# Altium PCB DC-DC_BUCK-BOOST.PcbDoc (part 2 of 3)
Units mm, origin at the board's own origin, x right, y up, seen from the top; angles counter-clockwise.
Board outline 250 x 400 mm, 4 copper layers (Top Layer 1, Top Layer, Bottom Layer, Bottom Layer 1), stack 0.603 mm thick; 332 components, 145 nets, 884 pads, 70 vias.
Unrouted connection lines stored in the file: 20.
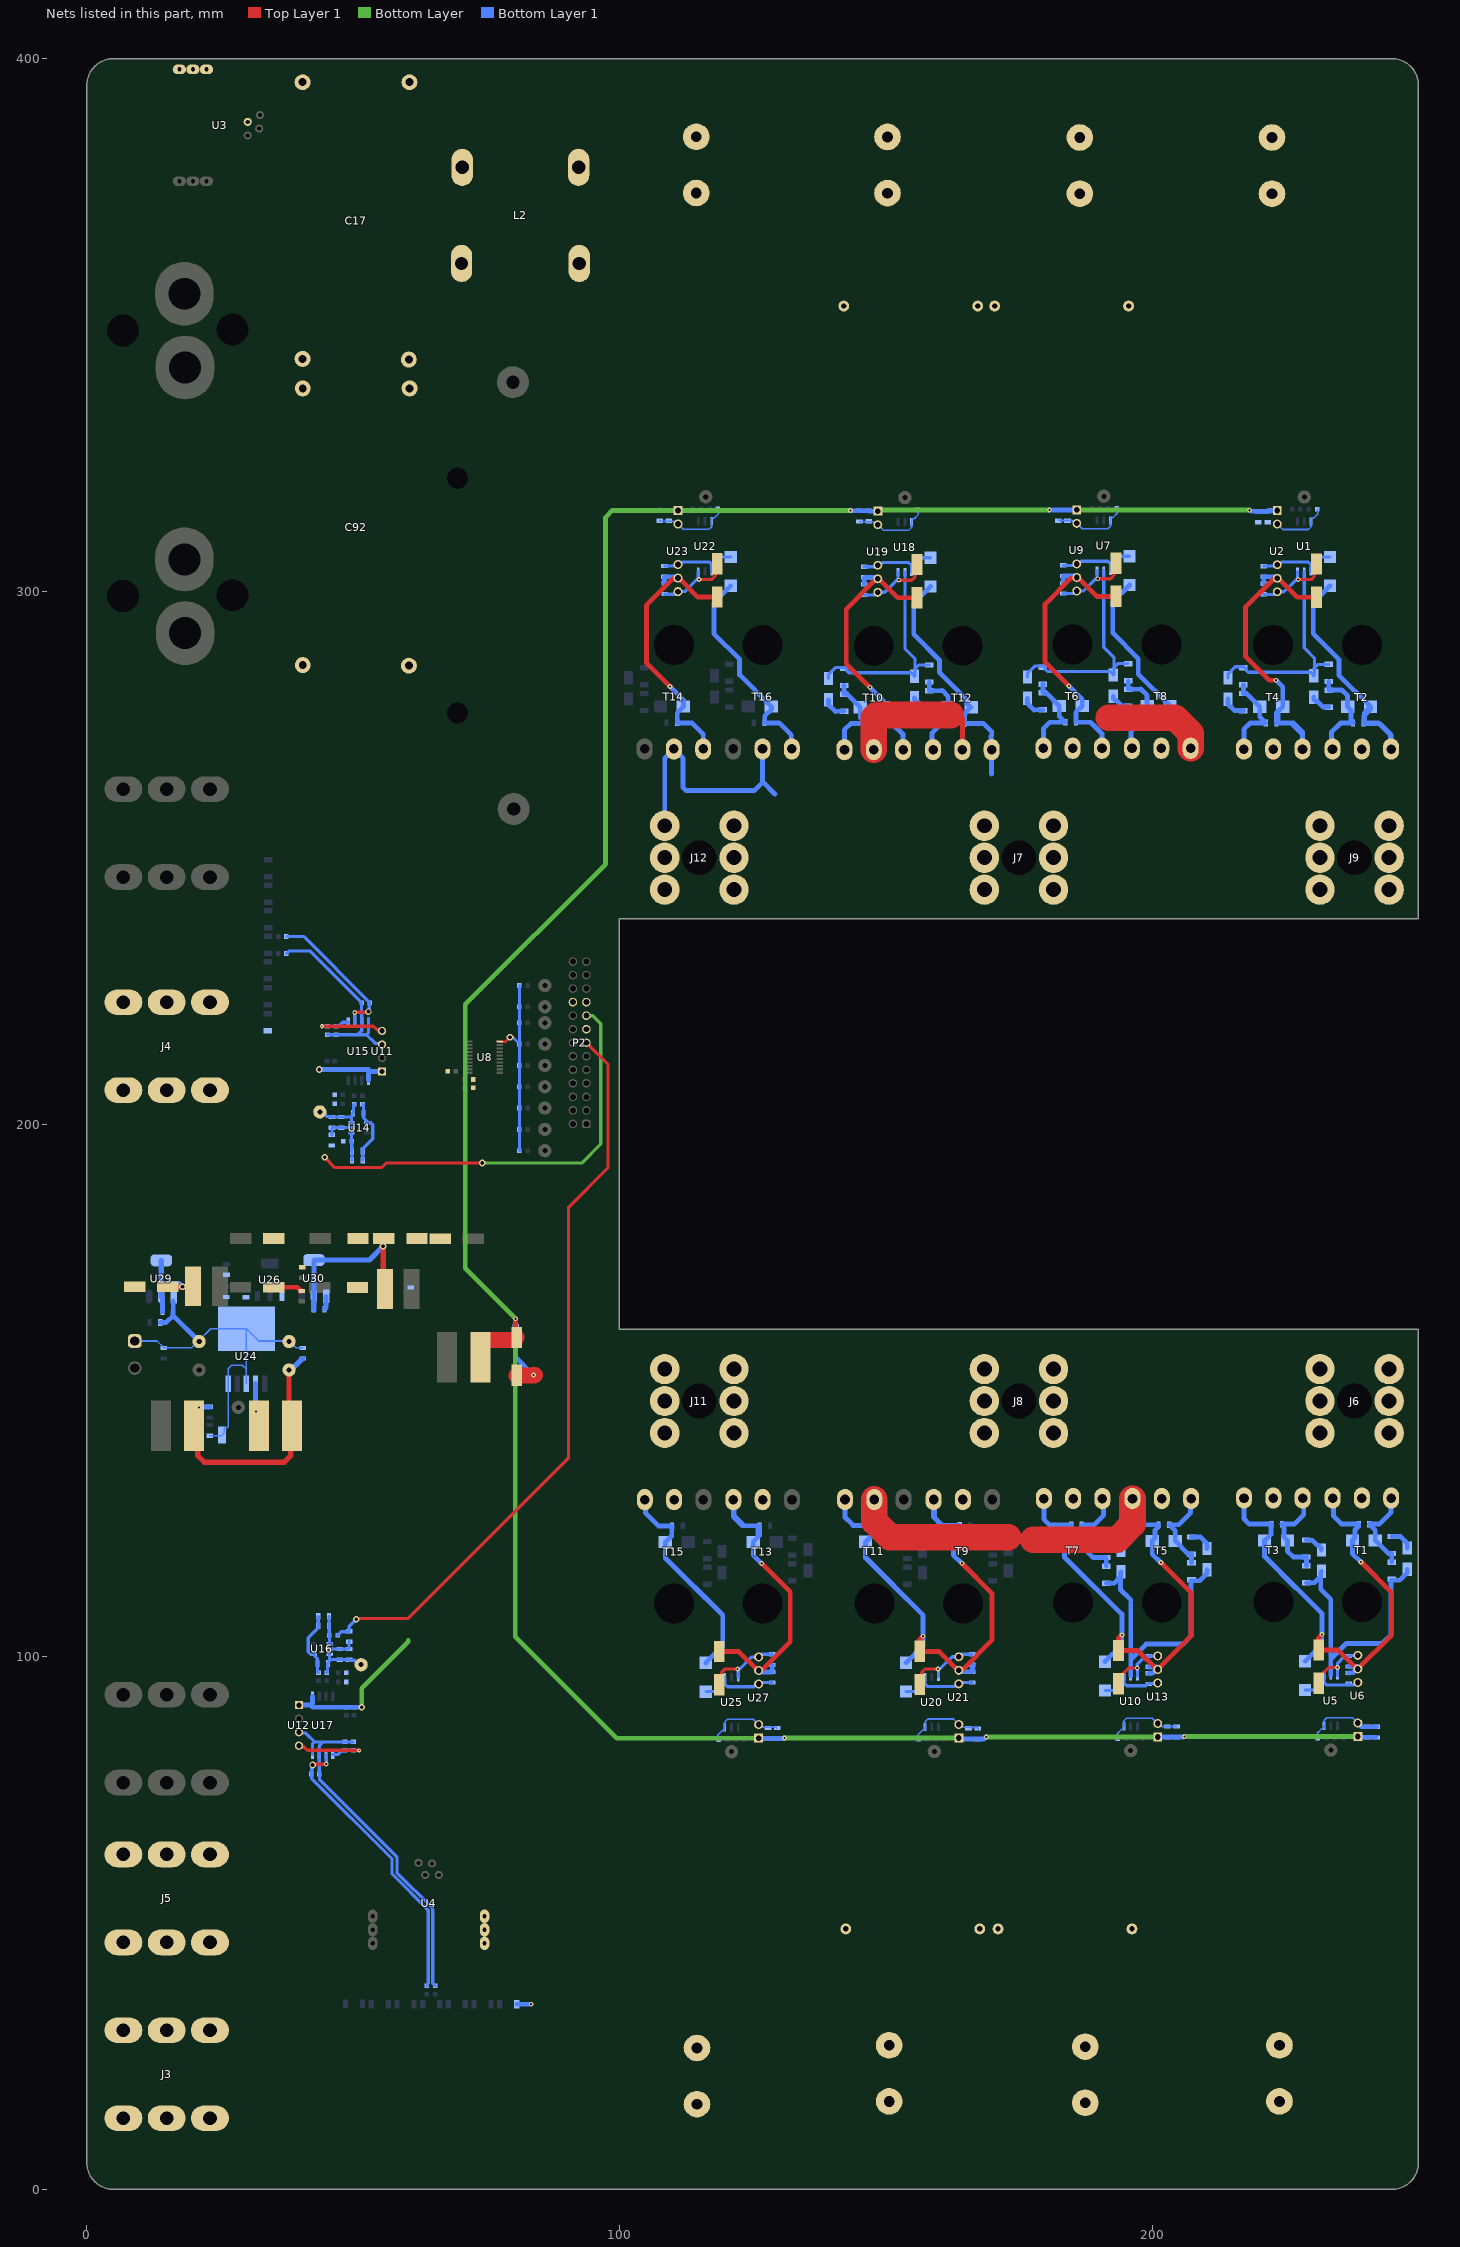
[diagram p3: the nets of this part, all layers, seen from the top]

## Via types
v1: diameter 0.9, hole 0.4, Top Layer 1 to Bottom Layer 1, tented both sides, 41 vias
v2: diameter 1.27, hole 0.711, Top Layer 1 to Bottom Layer 1, 21 vias
v3: diameter 0.7, hole 0.3, Top Layer 1 to Bottom Layer 1, 4 vias
v4: diameter 0.9, hole 0.4, Top Layer 1 to Bottom Layer 1, 2 vias
v5: diameter 0.8, hole 0.3, Top Layer 1 to Bottom Layer 1, 2 vias

## Nets (pads, with @x,y where several pads share a name; then routed paths per layer and width w, separated by ;. In a path a pad name is that pad's centre, name@x,y a point inside that pad or via, vN(x,y) a via of type N, cw(c..) or ccw(c..) an arc to the next point about the centre after c; other vN are vias at no path point) (continued)
+12: C4.2 C12.1 C21.2 C23.2 C27.2 C29.1 C43.2 C47.1 C61.2 C63.1 C67.2 C69.1 C73.2 C76.1 C84.2 C87.1 C109.1 C110.2 L1.2 U2.1 U6.1 U9.1 U13.1 U19.1 U21.1 U23.1 U27.1 | length 540.5
  Top Layer 1 w0.9: v1(80.5,163.45) 80.5,160.125 C109.1@80.7,159.925 C109.1@80.675,159.9
  Top Layer 1 w3: L1.2@73.9,156.25 73.9,159.125 74.275,159.5 80.275,159.5 C109.1@80.675,159.9
  Bottom Layer w0.9: v1@80.45,163.45 80.45,103.75 99.525,84.675 126.088,84.675 U27.1@126.126,84.713 ; v1(80.5,163.45) 71.05,172.9 71.05,222.45 97.4,248.8 97.4,313.925 98.668,315.193 U23.1@110.983,315.193 110.99,315.2 v1(143.4,315.2) ; v1(131,84.725) 131,84.75 131.008,84.742 U21.1@163.718,84.742 ; U19.1@148.504,315.059 148.745,315.3 v1(180.7,315.3) ; v1(168.85,84.9) 168.857,84.907 U13.1@201.049,84.907 ; U9.1@185.847,315.311 185.89,315.268 218.257,315.268 v1(218.3,315.225) ; v1(206.05,85) 206.057,85.007 U6.1@238.623,85.007
  Bottom Layer 1 w0.9: v1(80.5,163.45) 80.525,163.425 C110.2@80.525,162.05 ; C76.1@107.554,315.304 107.681,315.177 110.967,315.177 U23.1@110.983,315.193 ; U27.1@126.126,84.713 126.214,84.625 C84.2@127.875,84.625 C87.1@129.6,84.625 130.8,84.625 130.9,84.725 v1(131,84.725) ; v1(143.4,315.2) 143.35,315.15 143.375,315.125 C63.1@145.05,315.125 146.75,315.125 C61.2@146.775,315.15 146.866,315.059 U19.1@148.504,315.059 ; U21.1@163.718,84.742 163.91,84.55 C69.1@165.525,84.55 167.225,84.55 C67.2@167.25,84.525 168.375,84.525 168.75,84.9 v1(168.85,84.9) ; v1(180.7,315.3) 185.836,315.3 U9.1@185.847,315.311 ; U13.1@201.049,84.907 201.056,84.9 C47.1@202.825,84.9 C43.2@204.575,84.9 205.85,84.9 205.95,85 v1(206.05,85) ; v1(218.3,315.225) 218.4,315.225 218.575,315.05 219.875,315.05 C12.1@219.925,315 C4.2@221.7,315 221.869,315.169 U2.1@223.489,315.169 ; U6.1@238.623,85.007 238.755,84.875 C21.2@240.4,84.875 C23.2@241.95,84.875
GND: C4.1 C12.2 C21.1 C23.1 C27.1 C29.2 C33.1 C36.1 C38.1 C39.1 C40.1 C41.1 C43.1 C44.1 C45.1 C47.2 C52.1 C53.1 C56.1 C57.1 C61.1 C63.2 C67.1 C69.2 C73.1 C74.2 C76.2 C77.1 C79.1 C80.1 C81.2 C84.1 C86.1 C87.2 C88.1 C89.2 C93.1 C94.1 C97.2 C98.1 C99.2 C100.2 C101.1 C102.1 C103.2 C104.2 C105.1 C106.2 C107.1 C108.1 C109.2 C110.1 D15.2 P1.1 P2.15 P2.19 P2.20 R14.1 R15.1 R16.1 R17.1 R18.1 R19.1 R20.1 R21.1 R22.1 R23.1 R24.1 R25.1 R26.1 R27.1 R28.1 R29.1 R30.1 R31.1 R52.1 R53.1 R77.1 U1.3 U2.2 U3.3 U5.3 U6.2 U7.3 U8.10 U9.2 U10.3 U11.1 U12.1 U13.2 U14.2 U15.5 U16.2 U17.5 U18.3 U19.2 U20.3 U21.2 U22.3 U23.2 U24.3 U24.5 U24.6 U25.3 U26.1 U27.2 U29.1 U30.1 | length 303
  Top Layer 1 w0.5: U8.10@77.55,215.475 78.625,215.475 v2(79.45,216.3)
  Top Layer 1 w0.9: C100.2@35.073,169.375 39.525,169.375 40.225,168.675 C108.1@40.35,168.675
  Top Layer 1 w3: C109.2@80.7,152.825 84.075,152.825 84.1,152.85 83.875,152.85 v1(83.85,152.875)
  Bottom Layer w0.9: v2(51.6,90.525) 51.6,94.05 60.35,102.8 60.35,103.075
  Bottom Layer 1 w0.3: P1.1@8.994,159.262 P1.1@9,159.262 13.192,159.262 C77.1@14.478,157.976 19.669,157.976 20.971,159.278 23.251,161.558 U24.6@29.972,161.558 ; R77.1@23.114,141.498 23.13,141.482 23.495,141.482 23.511,141.498 25.289,141.498 D15.2@25.4,141.609 25.838,142.047 25.838,142.841 26.01,143.013 26.392,143.013 26.568,143.189 U24.5@26.568,151.253 26.568,154.08 27.178,154.69 29.21,154.69 29.972,153.928 ; U24.3@29.972,151.253 29.972,153.928 ; C79.1@40.513,157.976 39.259,157.976 37.973,159.262 32.268,159.262 U24.6@29.972,161.558 ; C76.2@107.554,313.304 107.681,313.177 110.12,313.177 110.644,312.653 U23.2@110.983,312.653 111.999,311.637 116.825,311.637 117.313,312.125 U22.3@117.313,313.141 ; U22.3@117.333,313.161 117.333,313.64 117.45,313.757 117.802,313.757 118.603,314.558 118.603,315.333 R15.1@118.489,315.447 ; R14.1@118.62,84.459 118.506,84.573 118.506,85.348 119.307,86.149 119.659,86.149 119.776,86.266 U25.3@119.776,86.745 ; U25.3@119.796,86.765 119.796,87.781 120.284,88.269 125.11,88.269 U27.2@126.126,87.253 126.465,87.253 126.989,86.729 129.428,86.729 C87.2@129.555,86.602 ; C63.2@145.075,313.17 145.202,313.043 147.641,313.043 148.165,312.519 U19.2@148.504,312.519 149.52,311.503 154.346,311.503 154.834,311.991 U18.3@154.834,313.007 ; U18.3@154.854,313.027 154.854,313.506 154.971,313.623 155.323,313.623 156.124,314.424 156.124,315.199 R17.1@156.01,315.313 ; R16.1@156.212,84.488 156.098,84.602 156.098,85.377 156.899,86.178 157.251,86.178 157.368,86.295 U20.3@157.368,86.774 ; U20.3@157.388,86.794 157.388,87.81 157.876,88.298 162.702,88.298 U21.2@163.718,87.282 164.057,87.282 164.581,86.758 167.02,86.758 C67.1@167.147,86.631 ; C69.2@165.822,86.631 C67.1@167.147,86.631 ; C67.1@167.401,86.504 167.274,86.631 C67.1@167.147,86.631 ; C29.2@182.418,313.422 182.545,313.295 184.984,313.295 185.508,312.771 U9.2@185.847,312.771 186.863,311.755 191.689,311.755 192.177,312.243 U7.3@192.177,313.259 ; U7.3@192.197,313.279 192.197,313.758 192.314,313.875 192.666,313.875 193.467,314.676 193.467,315.451 R19.1@193.353,315.565 ; R18.1@193.543,84.653 193.429,84.767 193.429,85.542 194.23,86.343 194.582,86.343 194.699,86.46 U10.3@194.699,86.939 ; U10.3@194.719,86.959 194.719,87.975 195.207,88.463 200.033,88.463 U13.2@201.049,87.447 201.596,86.9 C43.1@204.575,86.9 ; U2.2@223.489,312.629 224.505,311.613 229.331,311.613 229.819,312.101 U1.3@229.819,313.117 ; U1.3@229.839,313.137 229.839,313.616 229.956,313.733 230.308,313.733 231.109,314.534 231.109,315.309 R21.1@230.995,315.423 ; R20.1@231.117,84.753 231.003,84.867 231.003,85.642 231.804,86.443 232.156,86.443 232.273,86.56 U5.3@232.273,87.039 ; U5.3@232.293,87.059 232.293,88.075 232.781,88.563 237.607,88.563 U6.2@238.623,87.547 ; 29.972,153.928 U24.6@29.972,161.558
  Bottom Layer 1 w0.5: v2(79.45,216.3) 79.925,216.3 R27.1@81.225,215 ; R23.1@81.225,195 R24.1@81.225,226
  Bottom Layer 1 w0.6: U16.2@45.575,101.45 R53.1@47.5,101.45 C57.1@49.225,101.45 49.225,102.75 C53.1@49.275,102.8 ; C52.1@45.985,197.976 46.035,198.026 C56.1@46.035,199.326 R52.1@47.76,199.326 U14.2@49.685,199.326
  Bottom Layer 1 w0.9: C80.1@13.775,162.75 14.901,162.75 16.2,164.049 ; U29.1@16.246,166.775 16.246,164.846 C101.1@16.2,164.8 16.2,164.049 ; C74.2@21.082,159.167 20.971,159.278 16.2,164.049 ; U12.1@39.825,90.91 42.015,90.91 ; U17.5@42.38,92.551 42.38,91.275 42.015,90.91 ; v2(43.66,210.251) C38.1@45.11,210.251 C33.1@46.507,210.251 52.86,210.251 53.245,209.866 ; C107.1@44.625,165.225 44.93,165.53 U30.1@44.93,167.675 ; v2(51.6,90.525) C39.1@50.15,90.525 C36.1@48.753,90.525 42.4,90.525 42.015,90.91 ; U15.5@52.88,208.225 52.88,209.501 53.245,209.866 ; U11.1@55.435,209.866 53.245,209.866 ; C110.1@80.525,160.05 80.525,156.2 v1(83.85,152.875) ; U6.2@238.623,87.547 239.32,86.85 C23.1@242.125,86.85
NetC1_1: C1.1 C3.1 C7.2 C8.2 C16.1 C19.2 C42.1 C46.2 C49.1 C51.2 D12.1 D14.1 J3.1 J8.1 R68.2 R72.2 T5.3 T7.3 T9.2 T11.2 U13.6 | length 165.5
  Top Layer 1 w0.9: v1(194.326,104.1) 193.683,103.457 C46.2@193.683,101.163 197.294,101.163 200.85,97.607 U13.6@201.049,97.607 207.275,103.833 207.275,112.064 v1@201.639,117.7
  Top Layer 1 w5: T11.2@147.843,129.515 147.843,125.379 150.772,122.45 172.986,122.45 ; 177.691,121.95 193.382,121.95 196.311,124.879 T5.3@196.311,129.68
  Bottom Layer 1 w0.9: T7.3@179.674,129.68 179.674,125.802 180.691,124.785 R68.2@184.809,124.785 ; R68.2@184.759,124.61 184.759,124.276 184.749,124.266 184.749,122.854 183.632,121.737 D12.1@183.532,121.737 ; 189.429,112.797 183.532,118.694 D12.1@183.532,121.737 ; C49.1@191.143,99.037 194.255,102.149 194.255,104.029 v1(194.326,104.1) 194.326,108.006 183.532,118.8 D12.1@183.532,121.737 ; T5.3@196.311,129.68 196.451,129.54 196.451,126.325 197.991,124.785 R72.2@201.192,124.785 201.142,124.735 201.142,124.337 200.515,123.71 200.515,122.219 D14.1@200.033,121.737 200.033,119.237 201.57,117.7 v1@201.626,117.7 ; C51.2@199.35,96.875 200.134,96.875 200.866,97.607 U13.6@201.049,97.607 ; C42.1@199.35,98.125 199.4,98.075 200.814,98.075 U13.6@200.839,98.05
  other v1: 201.654,117.7
NetC1_2: C1.2 C3.2 C19.1 C83.1 C85.2 C90.1 C91.2 D31.1 D33.1 J5.1 R63.1 R101.2 R105.2 T13.3 T15.3 U27.6 | length 132.5
  Top Layer 1 w0.9: C85.2@118.76,100.969 122.371,100.969 125.927,97.413 U27.6@126.126,97.413 126.274,97.561 126.819,97.561 132.059,102.801 132.059,112.163 126.716,117.506 v1(126.703,117.506)
  Bottom Layer 1 w0.9: R63.1@80.725,34.75 v1(83.425,34.75) ; T15.3@104.751,129.486 104.91,129.327 104.91,126.915 107.284,124.541 109.836,124.541 R101.2@109.886,124.591 R101.2@109.886,124.072 ; R101.2@109.836,124.416 109.836,124.082 109.826,124.072 109.826,122.66 108.709,121.543 D31.1@108.609,121.543 ; C90.1@116.22,98.843 119.384,102.007 119.384,107.831 108.609,118.606 D31.1@108.609,121.543 ; 116.22,110.889 108.609,118.5 D31.1@108.609,121.543 ; U27.6@126.126,97.413 126.396,97.143 C91.2@128.666,97.143 C83.1@128.666,98.445 ; v1(126.703,117.506) 126.647,117.506 125.11,119.043 D33.1@125.11,121.543 126.269,122.702 ; T13.3@121.388,129.486 121.528,129.346 121.528,126.131 123.068,124.591 R105.2@126.269,124.591 ; T13.3@121.388,129.486 121.388,126.662 123.459,124.591 R105.2@126.269,124.591 ; T13.3@121.388,129.486 121.388,126.27 123.067,124.591 R105.2@126.269,124.591 ; 126.269,122.702 R105.2@126.269,124.591 ; 126.269,122.702 125.999,122.432 125.999,123.923 126.119,124.043 126.119,124.441 R105.2@126.269,124.591
NetC2_1: C2.1 C9.2 C13.1 C14.2 D2.1 D19.1 J9.1 R4.2 R84.2 T2.3 T4.3 T6.2 T8.2 U2.6 | length 113.8
  Top Layer 1 w0.9: v1@223.097,283.325 221.95,283.325 217.556,287.719 217.556,297.081 222.796,302.321 223.341,302.321 U2.6@223.489,302.469 223.688,302.469 227.244,298.913 C9.2@230.855,298.913
  Bottom Layer 1 w0.9: C2.1@220.949,301.437 C14.2@220.949,302.739 223.219,302.739 U2.6@223.489,302.469 ; v1(223.268,283.307) 224.505,282.07 D19.1@224.505,278.339 D19.1@223.616,277.45 ; T4.3@228.227,270.396 228.227,273.18 ; C13.1@233.395,301.039 230.231,297.875 230.231,292.051 235.056,287.226 235.056,284.289 D2.1@241.006,278.339 240.906,278.339 240.006,277.439 240.006,277.273 239.879,277.146 239.879,276.701 ; D2.1@241.053,278.292 241.053,277.875 239.879,276.701 ; R84.2@223.346,275.291 226.116,275.291 ; R84.2@223.346,275.291 223.346,277.18 D19.1@223.616,277.45 ; R84.2@223.346,275.291 223.496,275.441 223.496,275.839 223.616,275.959 D19.1@223.616,277.45 ; 226.116,275.291 226.537,275.291 228.227,273.601 228.227,273.18 ; 226.116,275.291 228.227,273.18 ; R4.2@239.729,275.291 R4.2@239.789,275.291 ; R4.2@239.729,275.291 R4.2@239.789,275.351 ; R4.2@239.729,275.291 R4.2@239.776,275.244 ; R4.2@239.776,275.244 239.789,275.257 R4.2@239.789,275.291 ; R4.2@239.776,275.244 239.856,275.164 242.618,275.164 ; R4.2@239.789,275.291 242.491,275.291 242.618,275.164 ; R4.2@239.789,275.291 R4.2@239.789,275.351 ; R4.2@239.789,275.351 239.789,276.611 239.879,276.701 ; R4.2@239.789,275.351 239.879,275.441 239.879,276.701 ; 242.618,275.164 244.76,273.022 244.76,270.5 T2.3@244.864,270.396 244.864,273.093 242.793,275.164 242.618,275.164
NetC2_2: C2.2 C9.1 U1.6 U2.7 | length 15
  Top Layer 1 w0.6: v1(227.426,302.215) 229.839,302.215 230.486,302.862 230.486,304.767 C9.1@230.855,305.136
  Bottom Layer 1 w0.6: C2.2@220.949,299.437 222.997,299.437 U2.7@223.489,299.929 224.759,299.929 227.026,302.196 227.407,302.196 v1(227.426,302.215) 227.299,302.342 U1.6@227.299,303.739
NetC5_1: C5.1 C10.1 C15.2 L2.4 T2.2 T4.2 | length 1.8
  Top Layer 1 w0.5: T4.2@222.727,268.573 T4.2@222.727,270.396
NetC5_2: C5.2 C6.1 C10.2 C11.1 C15.1 C18.2 C26.1 C28.2 C30.1 C31.2 D8.1 D10.1 J7.1 R35.2 R65.2 T6.3 T8.3 T10.2 T12.2 U9.6 | length 150.4
  Top Layer 1 w0.9: 147.742,276.242 148.3,276.8 ; 162.2,276.8 162.975,277.575 164.379,276.171 T12.2@164.379,270.286 ; v1(184.364,282.243) 179.914,286.693 179.914,297.614 184.763,302.463 185.699,302.463 U9.6@185.847,302.611 186.046,302.611 189.602,299.055 C28.2@193.213,299.055
  Top Layer 1 w5: T10.2@147.742,270.286 147.742,276.242 ; 148.3,276.8 162.2,276.8 ; 191.848,276.3 204.293,276.3 207.222,273.371 T8.3@207.222,270.538
  Bottom Layer 1 w0.9: C26.1@183.307,301.579 C31.2@183.307,302.881 185.577,302.881 U9.6@185.847,302.611 ; v1(184.364,282.243) 186.863,279.744 D10.1@186.863,278.481 185.704,277.322 R65.2@185.704,275.433 188.392,275.433 ; C30.1@195.753,301.181 192.589,298.017 192.589,292.193 197.414,287.368 197.414,284.431 D8.1@203.364,278.481 203.264,278.481 202.147,277.364 202.147,275.952 202.137,275.942 R35.2@202.137,275.608 ; R35.2@202.087,275.433 205.067,275.433 207.118,273.382 207.118,270.642 T8.3@207.222,270.538 ; 188.392,275.433 188.474,275.433 190.585,273.322 T6.3@190.585,270.538 190.571,270.552 190.571,273.254 188.392,275.433
NetC6_2: C6.2 C11.2 C18.1 C72.1 C75.2 C78.1 C82.2 D27.1 D29.1 L2.2 R94.2 R98.2 T14.3 T16.3 U23.6 | length 95.5
  Top Layer 1 w0.9: v1(109.5,282.125) 105.05,286.575 105.05,297.375 110.02,302.345 110.835,302.345 U23.6@110.983,302.493 111.182,302.493 114.738,298.937 C75.2@118.349,298.937
  Bottom Layer 1 w0.9: C72.1@108.443,301.461 C82.2@108.443,302.763 110.713,302.763 U23.6@110.983,302.493 ; v1(109.5,282.125) 111.999,279.626 D29.1@111.999,278.363 110.84,277.204 R98.2@110.84,275.315 113.61,275.315 115.721,273.204 T14.3@115.721,270.42 ; C78.1@120.889,301.063 117.725,297.899 117.725,292.075 122.55,287.25 122.55,284.313 D27.1@128.5,278.363 ; R94.2@127.223,275.315 129.985,275.315 132.254,273.046 132.254,270.524 T16.3@132.358,270.42 ; R94.2@127.27,275.268 127.283,275.281 127.283,276.635 128.547,277.899 D27.1@128.547,278.316
NetC7_1: C7.1 C8.1 C16.2 T1.2 T3.2 U4.8 U4.9 U4.10
NetC13_2: C13.2 C14.1 U1.4 U2.5 | length 14.6
  Bottom Layer 1 w0.6: C14.1@220.949,304.739 222.847,304.739 223.117,305.009 U2.5@223.489,305.009 ; U2.5@223.844,305.009 224.352,305.517 229.331,305.517 229.839,305.009 229.839,304.628 ; U1.4@229.839,303.739 229.839,304.628 ; C13.2@233.395,306.439 231.65,306.439 229.839,304.628
NetC17_1: C17.1 C92.2
NetC17_2: C17.2 L2.3 U3.5 U3.6 U3.7
NetC20_1: C20.1 C22.2 C24.1 C25.2 D4.1 D6.1 J6.1 R8.2 R12.2 T1.3 T3.3 T5.2 T7.2 U6.6 | length 110.4
  Top Layer 1 w0.9: v1(231.9,104.2) 231.257,103.557 C22.2@231.257,101.263 234.868,101.263 238.424,97.707 U6.6@238.623,97.707 244.875,103.959 244.875,112.138 239.213,117.8 v1(239.2,117.8)
  Bottom Layer 1 w0.9: T3.3@217.248,129.78 217.248,125.902 218.265,124.885 R8.2@222.383,124.885 ; R8.2@222.333,124.71 222.333,124.376 222.323,124.366 222.323,122.954 221.206,121.837 D4.1@221.106,121.837 ; 227.003,112.897 221.106,118.794 D4.1@221.106,121.837 ; C24.1@228.717,99.137 231.829,102.249 231.829,104.129 v1(231.9,104.2) 231.9,108.106 221.106,118.9 D4.1@221.106,121.837 ; T1.3@233.885,129.78 234.025,129.64 234.025,126.425 235.565,124.885 R12.2@238.766,124.885 238.716,124.835 238.716,124.437 238.089,123.81 238.089,122.319 D6.1@237.607,121.837 237.607,119.337 239.144,117.8 v1(239.2,117.8) ; C25.2@236.9,96.925 236.95,96.975 237.708,96.975 238.44,97.707 U6.6@238.623,97.707 ; C20.1@236.9,98.15 U6.6@238.413,98.15
NetC20_2: C20.2 C22.1 U5.6 U6.7 | length 12.1
  Top Layer 1 w0.6: C22.1@231.257,95.04 231.626,95.409 231.626,96.409 233.192,97.975 v1(234.825,97.975)
  Bottom Layer 1 w0.6: U5.6@234.813,96.437 234.819,96.443 234.819,97.969 v1(234.825,97.975) ; v1@234.825,98.002 234.825,98.775 236.1,100.05 236.8,100.05 C20.2@236.9,100.15 237.256,100.15 237.353,100.247 U6.7@238.623,100.247
NetC24_2: C24.2 C25.1 U5.4 U6.5 | length 12.6
  Bottom Layer 1 w0.6: C24.2@228.717,93.737 230.462,93.737 232.083,95.358 232.273,95.548 ; U5.4@232.273,96.437 232.273,95.548 ; C25.1@236.9,94.925 236.9,94.7 C25.1@236.942,94.659 ; U6.5@238.623,95.167 238.268,95.167 237.76,94.659 C25.1@236.942,94.659 ; 232.273,95.548 232.273,95.167 232.781,94.659 C25.1@236.942,94.659
NetC26_2: C26.2 C28.1 U7.6 U9.7 | length 15
  Top Layer 1 w0.6: v1(189.784,302.357) 192.197,302.357 192.844,303.004 192.844,304.909 C28.1@193.213,305.278
  Bottom Layer 1 w0.6: C26.2@183.307,299.579 185.355,299.579 U9.7@185.847,300.071 187.117,300.071 189.384,302.338 189.765,302.338 v1(189.784,302.357) 189.657,302.484 U7.6@189.657,303.881
NetC30_2: C30.2 C31.1 U7.4 U9.5 | length 14.6
  Bottom Layer 1 w0.6: C31.1@183.307,304.881 185.205,304.881 185.475,305.151 U9.5@185.847,305.151 ; U9.5@186.202,305.151 186.71,305.659 191.689,305.659 192.197,305.151 192.197,304.77 ; U7.4@192.197,303.881 192.197,304.77 ; C30.2@195.753,306.581 194.008,306.581 192.197,304.77
NetC32_1: C32.1 C34.1 C54.1 R54.1 U11.3 U15.3 U15.4 | length 38.6
  Bottom Layer 1 w0.6: R54.1@37.475,232 37.475,232.025 37.6,232.15 37.625,232.15 37.975,232.5 41.886,232.5 51.585,222.801 C54.1@51.585,222.776 51.585,220.912 ; C32.1@45.21,216.776 C34.1@46.785,216.776 50.86,216.776 ; 51.61,220.672 U15.3@51.61,219.125 51.61,217.526 50.86,216.776 ; 52.52,216.776 52.88,217.136 U15.4@52.88,219.125 U15.4@52.88,219.825 ; U11.3@55.435,214.946 55.253,215.128 54.158,215.128 52.51,216.776 50.86,216.776
NetC32_2: C32.2 C34.2 U11.4 U15.1 | length 17
  Top Layer 1 w0.6: v5(44.135,218.376) 44.16,218.351 53.829,218.351 54.513,217.668 55.253,217.668 U11.4@55.435,217.486
  Bottom Layer 1 w0.6: v5(44.135,218.376) 45.61,218.376 45.66,218.326 C34.2@46.785,218.326 46.91,218.451 47.36,218.451 48.034,219.125 U15.1@49.07,219.125
NetC35_1: C35.1 C37.1 C55.1 R55.1 U12.3 U17.3 U17.4 | length 68.6
  Bottom Layer 1 w0.6: U12.3@39.825,85.83 40.007,85.648 41.102,85.648 42.75,84 44.4,84 ; U17.4@42.38,81.651 42.38,83.64 42.74,84 ; C55.1@43.65,78.025 U17.3@43.65,81.651 43.65,83.25 44.4,84 ; C55.1@43.675,78 43.675,76.975 58.225,62.425 58.225,59.45 64.916,52.759 64.916,52.503 64.95,52.469 64.95,38.676 65.25,38.376 65.25,38.325 65.375,38.2 R55.1@65.4,38.2 ; C35.1@50.05,84 C37.1@48.475,84 44.4,84
NetC35_2: C35.2 C37.2 U12.4 U17.1 | length 17
  Top Layer 1 w0.6: U12.4@39.825,83.29 40.007,83.108 40.747,83.108 41.431,82.425 51.1,82.425 v5(51.125,82.4)
  Bottom Layer 1 w0.6: U17.1@46.19,81.651 47.226,81.651 47.9,82.325 48.35,82.325 C37.2@48.475,82.45 49.6,82.45 49.65,82.4 v5(51.125,82.4)
NetC42_2: C42.2 C46.1 U10.6 U13.7 | length 12
  Top Layer 1 w0.6: C46.1@193.683,94.94 194.052,95.309 194.052,96.309 195.618,97.875 v1(197.2,97.875)
  Bottom Layer 1 w0.6: v1@197.2,97.848 197.239,97.809 U10.6@197.239,96.337 ; v1(197.2,97.875) 197.2,98.575 198.65,100.025 199.25,100.025 199.361,100.136 201.038,100.136 U13.7@201.049,100.147
NetC48_1: C48.1 C58.2 R50.1 R58.2 U14.4 | length 12.4
  Bottom Layer 1 w0.6: R58.2@51.785,193.201 51.81,193.226 51.81,195.376 53.685,197.251 53.685,199.9 53.334,200.251 52.685,200.251 U14.4@52.635,200.301 ; R50.1@51.785,203.751 51.81,203.751 51.935,203.626 51.935,203.601 51.96,203.576 C48.1@51.96,202.051 51.96,201.126 U14.4@52.635,200.451
NetC48_2: C48.2 C56.2 R42.1 R52.2 TP19.1 U14.3 | length 9.7
  Bottom Layer 1 w0.6: TP19.1@43.76,202.276 44.211,202.276 45.061,201.426 45.935,201.426 C56.2@46.035,201.326 R52.2@47.785,201.326 ; R52.2@47.76,201.326 49.46,201.326 C48.2@49.96,201.826 ; U14.3@49.685,200.276 49.685,201.326 ; C48.2@49.96,202.051 50.06,202.151 50.06,203.626 50.185,203.751 R42.1@50.21,203.751
NetC49_2: C49.2 C51.1 U10.4 U13.5 | length 12.3
  Bottom Layer 1 w0.6: C49.2@191.143,93.637 192.888,93.637 194.508,95.258 194.699,95.448 ; U10.4@194.699,96.337 194.699,95.448 ; U13.5@201.049,95.067 200.953,94.971 199.221,94.971 198.809,94.559 195.207,94.559 194.699,95.067 194.699,95.448
NetC50_1: C50.1 C59.2 R51.1 R59.2 U16.4 | length 12.4
  Bottom Layer 1 w0.6: U16.4@42.625,100.325 43.3,99.65 C50.1@43.3,98.725 43.3,97.2 43.325,97.175 43.325,97.15 43.45,97.025 R51.1@43.475,97.025 ; U16.4@42.625,100.475 42.575,100.525 41.926,100.525 41.575,100.876 41.575,103.525 43.45,105.4 43.45,107.55 R59.2@43.475,107.575
NetC50_2: C50.2 C57.2 R43.1 R53.2 TP20.1 U16.3 | length 9.7
  Bottom Layer 1 w0.6: R43.1@45.05,97.025 45.075,97.025 45.2,97.15 45.2,98.625 C50.2@45.3,98.725 ; C50.2@45.3,98.95 45.8,99.45 R53.2@47.5,99.45 ; 45.575,99.45 U16.3@45.575,100.5 ; R53.2@47.475,99.45 C57.2@49.225,99.45 49.325,99.35 50.199,99.35 51.049,98.5 TP20.1@51.5,98.5
NetC52_2: C52.2 P2.17 R44.1 | length 80.4
  Top Layer 1 w0.6: v2(44.66,193.751) 46.586,191.825 55.325,191.825 56.175,192.675 v2(74.225,192.675)
  Bottom Layer w0.6: v2(74.225,192.675) 92.925,192.675 96.5,196.25 96.5,218.85 95.005,220.345 P2.17@93.8,220.345
NetC53_2: C53.2 P2.13 R45.1 | length 140.4
  Top Layer 1 w0.6: v2(50.6,107.025) 50.6,107.05 50.7,107.15 60.225,107.15 90.45,137.375 90.45,184.4 97.85,191.8 97.85,211.215 P2.13@93.8,215.265
  Bottom Layer 1 w0.6: R45.1@47.1,104.025 47.1,104.05 47.75,104.7 49.175,104.7 C53.2@49.275,104.8 49.275,105.7 v2(50.6,107.025)
NetC54_2: C54.2 R46.1 U15.2 | length 27.1
  Top Layer 1 w0.6: v4(50.31,220.926) 50.367,220.983 52.742,220.983 v2(52.86,221.101)
  Bottom Layer 1 w0.6: R46.1@37.475,235.225 40.711,235.225 53.135,222.801 C54.2@53.135,222.776 53.01,222.651 53.01,221.432 52.988,221.411 52.988,221.229 v2(52.86,221.101) ; v4(50.31,220.926) 50.31,219.155 U15.2@50.34,219.125
NetC55_2: C55.2 R47.1 U17.2 | length 55.3
  Top Layer 1 w0.6: v2(42.4,79.675) 42.518,79.793 44.893,79.793 v4(44.95,79.85)
  Bottom Layer 1 w0.6: v2(42.4,79.675) 42.272,79.547 42.272,79.366 42.25,79.344 42.25,78.125 C55.2@42.125,78 42.25,77.875 42.25,77.125 57.3,62.075 57.3,59.221 64.1,52.421 64.1,38.676 63.975,38.551 63.975,38.325 63.85,38.2 R47.1@63.825,38.2 ; U17.2@44.92,81.651 44.95,81.621 v4(44.95,79.85)
NetC58_1: C58.1 R44.2 R58.1 U14.1 | length 5.5
  Bottom Layer 1 w0.6: U14.1@49.385,198.351 U14.1@49.685,198.351 ; U14.1@49.685,198.376 49.698,198.364 49.698,196.764 49.76,196.701 49.76,195.001 C58.1@49.81,194.951 49.798,194.938 49.798,193.213 R58.1@49.785,193.201
NetC59_1: C59.1 R45.2 R59.1 U16.1 | length 5.5
  Bottom Layer 1 w0.6: R59.1@45.475,107.575 45.463,107.563 45.463,105.838 C59.1@45.45,105.825 45.5,105.775 45.5,104.075 45.563,104.012 45.563,102.413 U16.1@45.575,102.4 ; U16.1@45.575,102.425 U16.1@45.875,102.425
NetC60_1: C60.1 C62.2 C64.1 C65.2 D17.1 D21.1 J12.1 R75.2 R81.2 T10.3 T12.3 T14.2 T16.2 U19.6 | length 151.6
  Top Layer 1 w0.9: v1(147.021,281.991) 142.571,286.441 142.571,296.671 147.871,301.971 147.907,301.971 148.294,302.359 148.703,302.359 152.259,298.803 C62.2@155.87,298.803
  Bottom Layer 1 w0.9: J12.1@108.5,256 108.5,268.699 T14.2@110.221,270.42 111.95,268.691 111.95,263.15 112.5,262.6 125.275,262.6 126.858,264.183 ; T16.2@126.858,270.42 126.858,264.267 129.2,261.925 ; C60.1@145.964,301.327 C65.2@145.964,302.629 148.234,302.629 U19.6@148.504,302.359 ; v1(147.021,281.991) 149.52,279.492 D21.1@149.52,278.229 148.361,277.07 R81.2@148.361,275.181 151.131,275.181 ; T10.3@153.242,270.286 153.242,273.07 ; C64.1@158.41,300.929 155.246,297.765 155.246,291.941 160.071,287.116 160.071,284.804 165.221,279.654 165.221,278.929 D17.1@165.921,278.229 ; R75.2@164.744,275.181 168.369,275.181 169.879,273.671 169.879,272.912 ; R75.2@164.794,275.356 164.794,277.002 165.221,277.429 165.221,277.529 D17.1@165.921,278.229 ; 169.775,272.912 169.775,270.39 T12.3@169.879,270.286 169.85,270.257 169.85,265.725 ; 151.131,275.181 151.269,275.181 153.242,273.208 153.242,273.07 ; 151.131,275.181 153.242,273.07 ; D17.1@165.921,278.229 D17.1@166.021,278.229 D17.1@165.921,278.229
NetC60_2: C60.2 C62.1 U18.6 U19.7 | length 15
  Top Layer 1 w0.6: v1(152.441,302.105) 154.854,302.105 155.501,302.752 155.501,304.657 C62.1@155.87,305.026
  Bottom Layer 1 w0.6: C60.2@145.964,299.327 148.012,299.327 U19.7@148.504,299.819 149.774,299.819 152.041,302.086 152.422,302.086 v1(152.441,302.105) 152.314,302.232 U18.6@152.314,303.629
NetC64_2: C64.2 C65.1 U18.4 U19.5 | length 14.6
  Bottom Layer 1 w0.6: C65.1@145.964,304.629 147.862,304.629 148.132,304.899 U19.5@148.504,304.899 ; U19.5@148.859,304.899 149.367,305.407 154.346,305.407 154.854,304.899 154.854,304.518 ; U18.4@154.854,303.629 154.854,304.518 ; C64.2@158.41,306.329 156.665,306.329 154.854,304.518
NetC66_1: C66.1 C68.2 C70.1 C71.2 D23.1 D25.1 J11.1 R87.2 R91.2 T9.3 T11.3 T13.2 T15.2 U21.6 | length 137.7
  Top Layer 1 w0.9: v1(156.975,103.85) 156.352,103.227 C68.2@156.352,100.998 159.963,100.998 163.519,97.442 U21.6@163.718,97.442 163.866,97.59 164.411,97.59 169.925,103.104 169.925,111.918 164.308,117.535 v1(164.295,117.535)
  Bottom Layer 1 w0.9: T11.3@142.343,129.515 142.343,126.157 143.85,124.65 147.448,124.65 R87.2@147.478,124.62 ; R87.2@147.428,124.445 147.428,124.111 147.418,124.101 147.418,122.689 146.301,121.572 D23.1@146.201,121.572 ; R87.2@147.478,124.101 147.478,122.849 ; R87.2@147.478,124.111 147.478,122.849 ; C70.1@153.812,98.872 156.976,102.036 156.976,107.86 146.201,118.635 D23.1@146.201,121.572 ; 153.812,110.918 146.201,118.529 D23.1@146.201,121.572 ; U21.6@163.718,97.442 163.988,97.172 C71.2@166.258,97.172 C66.1@166.258,98.474 ; v1(164.295,117.535) 164.239,117.535 162.702,119.072 D25.1@162.702,121.572 163.861,122.731 ; D23.1@146.201,121.572 147.478,122.849 ; T9.3@158.98,129.515 159.12,129.375 159.12,126.16 160.66,124.62 R91.2@163.861,124.62 ; T9.3@158.98,129.515 158.98,126.299 160.659,124.62 R91.2@163.861,124.62 ; T9.3@158.98,129.515 158.98,126.195 160.555,124.62 R91.2@163.861,124.62 ; 163.861,122.731 R91.2@163.861,124.62 ; 163.861,122.731 163.591,122.461 163.591,123.952 163.711,124.072 163.711,124.47 R91.2@163.861,124.62
NetC66_2: C66.2 C68.1 U20.6 U21.7 | length 15
  Top Layer 1 w0.6: C68.1@156.352,94.775 156.721,95.144 156.721,97.049 157.368,97.696 v1(159.781,97.696)
  Bottom Layer 1 w0.6: U20.6@159.908,96.172 159.908,97.569 v1(159.781,97.696) 159.8,97.715 160.181,97.715 162.448,99.982 U21.7@163.718,99.982 164.21,100.474 C66.2@166.258,100.474
NetC70_2: C70.2 C71.1 U20.4 U21.5 | length 14.6
  Bottom Layer 1 w0.6: C70.2@153.812,93.472 155.557,93.472 157.368,95.283 ; U20.4@157.368,96.172 157.368,95.283 ; U21.5@163.363,94.902 162.855,94.394 157.876,94.394 157.368,94.902 157.368,95.283 ; U21.5@163.718,94.902 164.09,94.902 164.36,95.172 C71.1@166.258,95.172
NetC72_2: C72.2 C75.1 U22.6 U23.7 | length 15
  Top Layer 1 w0.6: v1(114.92,302.239) 117.333,302.239 117.98,302.886 117.98,304.791 C75.1@118.349,305.16
  Bottom Layer 1 w0.6: C72.2@108.443,299.461 110.491,299.461 U23.7@110.983,299.953 112.253,299.953 114.52,302.22 114.901,302.22 v1(114.92,302.239) 114.793,302.366 U22.6@114.793,303.763
NetC78_2: C78.2 C82.1 U22.4 U23.5 | length 14.6
  Bottom Layer 1 w0.6: C82.1@108.443,304.763 110.341,304.763 110.611,305.033 U23.5@110.983,305.033 ; U23.5@111.338,305.033 111.846,305.541 116.825,305.541 117.333,305.033 117.333,304.652 ; U22.4@117.333,303.763 117.333,304.652 ; C78.2@120.889,306.463 119.144,306.463 117.333,304.652
NetC79_2: C79.2 C81.1 L4.2 L5.1 R76.2 | length 46.3
  Top Layer 1 w1: L5.1@20.143,143.387 20.852,142.678 20.852,137.723 22.046,136.529 37.079,136.529 38.273,137.723 38.273,143.102 L4.2@38.558,143.387 37.973,143.972 C81.1@37.973,153.833 C81.1@37.973,153.928
  Bottom Layer 1 w1: v1(21.082,146.816) 21.138,146.872 R76.2@23.059,146.872 ; C81.1@37.973,153.928 38.465,153.928 C79.2@40.513,155.976
NetC83_2: C83.2 C85.1 U25.6 U27.7 | length 15
  Top Layer 1 w0.6: C85.1@118.76,94.746 119.129,95.115 119.129,97.02 119.776,97.667 v1(122.189,97.667)
  Bottom Layer 1 w0.6: U25.6@122.316,96.143 122.316,97.54 v1(122.189,97.667) 122.208,97.686 122.589,97.686 124.856,99.953 U27.7@126.126,99.953 126.618,100.445 C83.2@128.666,100.445
NetC90_2: C90.2 C91.1 U25.4 U27.5 | length 14.6
  Bottom Layer 1 w0.6: C90.2@116.22,93.443 117.965,93.443 119.776,95.254 ; U25.4@119.776,96.143 119.776,95.254 ; U27.5@125.771,94.873 125.263,94.365 120.284,94.365 119.776,94.873 119.776,95.254 ; U27.5@126.126,94.873 126.498,94.873 126.768,95.143 C91.1@128.666,95.143
NetC92_1: C92.1 J4.1 L2.1 R62.1
NetC99_1: C99.1 C101.2 L7.1 U29.2 | length 19.2
  Top Layer 1 w1: C99.1@15.198,169.425 19.855,169.425 L7.1@19.979,169.549
  Bottom Layer 1 w1: U29.2@14,174.395 U29.2@14,168.725 ; C101.2@14.2,164.8 14.2,167.405 U29.2@14,167.605 U29.2@14,168.725 ; v2(17.95,169.45) 17.877,169.45 17.302,170.025 15.3,170.025 U29.2@14,168.725
NetC106_1: C106.1 C107.2 L8.1 U30.2 | length 33
  Top Layer 1 w1: C106.1@55.775,178.5 55.625,178.35 v2(55.625,177.05) 55.625,169.35 L8.1@55.975,169
  Bottom Layer 1 w1: C107.2@42.625,165.225 42.633,165.233 42.633,166.913 42.64,166.921 U30.2@42.64,174.465 53.04,174.465 v2(55.625,177.05)
NetD1_1: D1.1 D18.1 R3.2 R83.2 U1.5 | length 41.7
  Bottom Layer 1 w0.6: D18.1@214.218,283.768 214.218,284.435 215.615,285.832 217.254,285.832 217.644,285.442 217.644,285.167 217.996,284.816 229.797,284.816 230.347,284.266 D1.1@230.347,284.149 ; U1.5@228.569,303.739 228.569,289.388 230.474,287.483 230.474,285.451 D1.1@230.474,284.276 ; 230.347,285.451 231.185,286.289 R3.2@233.141,286.289
NetD1_2: D1.2 R1.2 | length 3.8
  Bottom Layer 1 w0.9: D1.2@230.347,280.149 230.347,279.749 230.747,279.349 230.988,279.349 232.024,278.313 233.091,278.313 R1.2@233.141,278.263
NetD2_2: D2.2 R1.1 R3.1 R4.1 T2.1 | length 19.2
  Bottom Layer 1 w0.9: R3.1@233.141,283.089 R1.1@233.141,281.463 235.503,281.463 235.554,281.514 236.706,280.362 D2.2@236.706,278.339 237.332,277.713 237.332,275.813 237.679,275.466 237.679,275.341 R4.1@237.729,275.291 237.332,275.291 235.427,275.291 233.649,273.513 233.649,270.611 T2.1@233.864,270.396
NetD3_1: D3.1 D5.1 R7.2 R11.2 U5.5 | length 50.8
  Bottom Layer 1 w0.9: R7.2@228.971,113.887 230.461,113.887 231.638,115.064 D3.1@231.638,115.9 ; 231.638,114.663 231.638,112.693 233.543,110.788 233.543,99.568 ; D3.1@231.765,115.91 D3.1@231.765,116.027 ; U5.5@233.543,96.437 233.543,99.568 ; D5.1@247.894,116.408 247.894,115.741 246.497,114.344 244.858,114.344 244.858,104.108 243.225,102.475 236.45,102.475 233.543,99.568
NetD3_2: D3.2 R6.2 | length 3.8
  Bottom Layer 1 w0.9: R6.2@228.971,121.913 229.021,121.863 230.088,121.863 231.124,120.827 231.365,120.827 231.765,120.427 D3.2@231.765,120.027
NetD4_2: D4.2 R6.1 R7.1 R8.1 T3.1 | length 19.2
  Bottom Layer 1 w0.9: T3.1@228.248,129.78 228.463,129.565 228.463,126.663 226.685,124.885 224.78,124.885 R8.1@224.383,124.885 224.433,124.835 224.433,124.71 224.78,124.363 224.78,122.463 D4.2@225.406,121.837 225.406,119.814 226.558,118.662 226.609,118.713 R6.1@228.971,118.713 R7.1@228.971,117.087
NetD5_2: D5.2 R9.2 | length 4.4
  Bottom Layer 1 w0.9: R9.2@244.968,122.56 246.585,122.56 246.624,122.599 247.894,121.329 D5.2@247.894,120.408
NetD6_2: D6.2 R9.1 R11.1 R12.1 T1.1 | length 16.9
  Bottom Layer 1 w0.9: T1.1@244.885,129.78 244.855,129.75 244.855,127.08 242.66,124.885 R12.1@240.766,124.885 241.907,123.744 D6.2@241.907,121.837 244.384,119.36 R9.1@244.968,119.36 R11.1@244.968,117.734
NetD7_1: D7.1 D9.1 R34.2 R64.2 U7.5 | length 41.7
  Bottom Layer 1 w0.6: D9.1@176.576,283.91 176.576,284.577 177.973,285.974 179.612,285.974 180.002,285.584 180.002,285.309 180.354,284.958 192.155,284.958 192.705,284.408 D7.1@192.705,284.291 ; U7.5@190.927,303.881 190.927,289.53 192.832,287.625 192.832,285.593 D7.1@192.832,284.418 ; 192.705,285.593 193.543,286.431 R34.2@195.499,286.431
NetD7_2: D7.2 R13.2 | length 3.8
  Bottom Layer 1 w0.9: D7.2@192.705,280.291 192.705,279.891 193.105,279.491 193.346,279.491 194.382,278.455 195.449,278.455 R13.2@195.499,278.405
NetD8_2: D8.2 R13.1 R34.1 R35.1 T8.1 | length 19.2
  Bottom Layer 1 w0.9: R34.1@195.499,283.231 R13.1@195.499,281.605 197.861,281.605 197.912,281.656 199.064,280.504 D8.2@199.064,278.481 199.69,277.855 199.69,275.955 200.037,275.608 200.037,275.483 R35.1@200.087,275.433 199.69,275.433 197.785,275.433 196.007,273.655 196.007,270.753 T8.1@196.222,270.538
NetD9_2: D9.2 R36.2 | length 4.4
  Bottom Layer 1 w0.9: D9.2@176.576,279.91 176.576,278.989 177.846,277.719 177.885,277.758 R36.2@179.502,277.758
NetD10_2: D10.2 R36.1 R64.1 R65.1 T6.1 | length 17.6
  Bottom Layer 1 w0.9: R64.1@179.502,282.584 R36.1@179.502,280.958 180.086,280.958 D10.2@182.563,278.481 182.563,276.574 R65.1@183.704,275.433 180.767,275.433 179.585,274.251 179.585,270.792 T6.1@179.585,270.538
NetD11_1: D11.1 D13.1 R67.2 R71.2 U10.5 | length 50.9
  Bottom Layer 1 w0.9: R67.2@191.397,113.787 192.887,113.787 194.064,114.964 D11.1@194.064,115.8 ; 194.064,114.563 194.064,112.593 195.969,110.688 195.969,99.468 ; D11.1@194.191,115.81 D11.1@194.191,115.927 ; U10.5@195.969,96.337 195.969,99.468 ; D13.1@210.32,116.308 210.32,115.641 208.923,114.244 207.284,114.244 207.284,103.859 205.8,102.375 198.876,102.375 195.969,99.468
NetD11_2: D11.2 R66.2 | length 3.8
  Bottom Layer 1 w0.9: R66.2@191.397,121.813 191.447,121.763 192.514,121.763 193.55,120.727 193.791,120.727 194.191,120.327 D11.2@194.191,119.927
NetD12_2: D12.2 R66.1 R67.1 R68.1 T7.1 | length 19.2
  Bottom Layer 1 w0.9: T7.1@190.674,129.68 190.889,129.465 190.889,126.563 189.111,124.785 187.206,124.785 R68.1@186.809,124.785 186.859,124.735 186.859,124.61 187.206,124.263 187.206,122.363 D12.2@187.832,121.737 187.832,119.714 188.984,118.562 189.035,118.613 R66.1@191.397,118.613 R67.1@191.397,116.987
NetD13_2: D13.2 R69.2 | length 4.4
  Bottom Layer 1 w0.9: R69.2@207.394,122.46 209.011,122.46 209.05,122.499 210.32,121.229 D13.2@210.32,120.308
NetD14_2: D14.2 R69.1 R71.1 R72.1 T5.1 | length 16.9
  Bottom Layer 1 w0.9: T5.1@207.311,129.68 207.23,129.599 207.23,127.03 204.985,124.785 R72.1@203.192,124.785 204.333,123.644 D14.2@204.333,121.737 206.81,119.26 R69.1@207.394,119.26 R71.1@207.394,117.634
NetD15_1: D15.1 L4.1 U24.2 | length 9.7
  Bottom Layer 1 w0.3: D15.1@31.61,141.609 D15.1@31.75,141.749
  Bottom Layer 1 w1: U24.2@31.674,151.253 31.674,146.203 31.75,146.127 v1(31.75,146.054) D15.1@31.75,141.749
NetD16_1: D16.1 D20.1 R74.2 R80.2 U18.5 | length 41.7
  Bottom Layer 1 w0.6: D20.1@139.233,283.658 139.233,284.325 140.63,285.722 142.269,285.722 142.659,285.332 142.659,285.057 143.011,284.706 154.812,284.706 155.362,284.156 D16.1@155.362,284.039 ; U18.5@153.584,303.629 153.584,289.278 155.489,287.373 155.489,285.341 D16.1@155.489,284.166 ; 155.362,285.341 156.2,286.179 R74.2@158.156,286.179
NetD16_2: D16.2 R73.2 | length 3.8
  Bottom Layer 1 w0.9: D16.2@155.362,280.039 155.362,279.639 155.762,279.239 156.003,279.239 157.039,278.203 158.106,278.203 R73.2@158.156,278.153
NetD17_2: D17.2 R73.1 R74.1 R75.1 T12.1 | length 19.2
  Bottom Layer 1 w0.9: R74.1@158.156,282.979 R73.1@158.156,281.353 160.518,281.353 160.569,281.404 161.721,280.252 D17.2@161.721,278.229 162.347,277.603 162.347,275.703 162.694,275.356 162.694,275.231 R75.1@162.744,275.181 162.347,275.181 160.442,275.181 158.664,273.403 158.664,270.501 T12.1@158.879,270.286
NetD18_2: D18.2 R82.2 | length 4.4
  Bottom Layer 1 w0.9: D18.2@214.218,279.768 214.218,278.847 215.488,277.577 215.527,277.616 R82.2@217.144,277.616
NetD19_2: D19.2 R82.1 R83.1 R84.1 T4.1 | length 17.6
  Bottom Layer 1 w0.9: R83.1@217.144,282.442 R82.1@217.144,280.816 217.728,280.816 D19.2@220.205,278.339 220.205,276.432 R84.1@221.346,275.291 218.409,275.291 217.227,274.109 217.227,270.65 T4.1@217.227,270.396
NetD20_2: D20.2 R78.2 | length 4.4
  Bottom Layer 1 w0.9: D20.2@139.233,279.658 139.233,278.737 140.503,277.467 140.542,277.506 R78.2@142.159,277.506
NetD21_2: D21.2 R78.1 R80.1 R81.1 T10.1 | length 17.6
  Bottom Layer 1 w0.9: R80.1@142.159,282.332 R78.1@142.159,280.706 142.743,280.706 D21.2@145.22,278.229 145.22,276.322 R81.1@146.361,275.181 143.424,275.181 142.242,273.999 142.242,270.54 T10.1@142.242,270.286